# Altium PCB stabilizer_current_sense.PcbDoc (part 2 of 3)
Units mm, origin at the board's own origin, x right, y up, seen from the top; angles counter-clockwise.
Board outline 113.55 x 100 mm, 4 copper layers (Top, L2, L3, Bottom Layer), stack 1.579 mm thick; 178 components, 65 nets, 463 pads, 231 vias.
Unrouted connection lines stored in the file: 53.
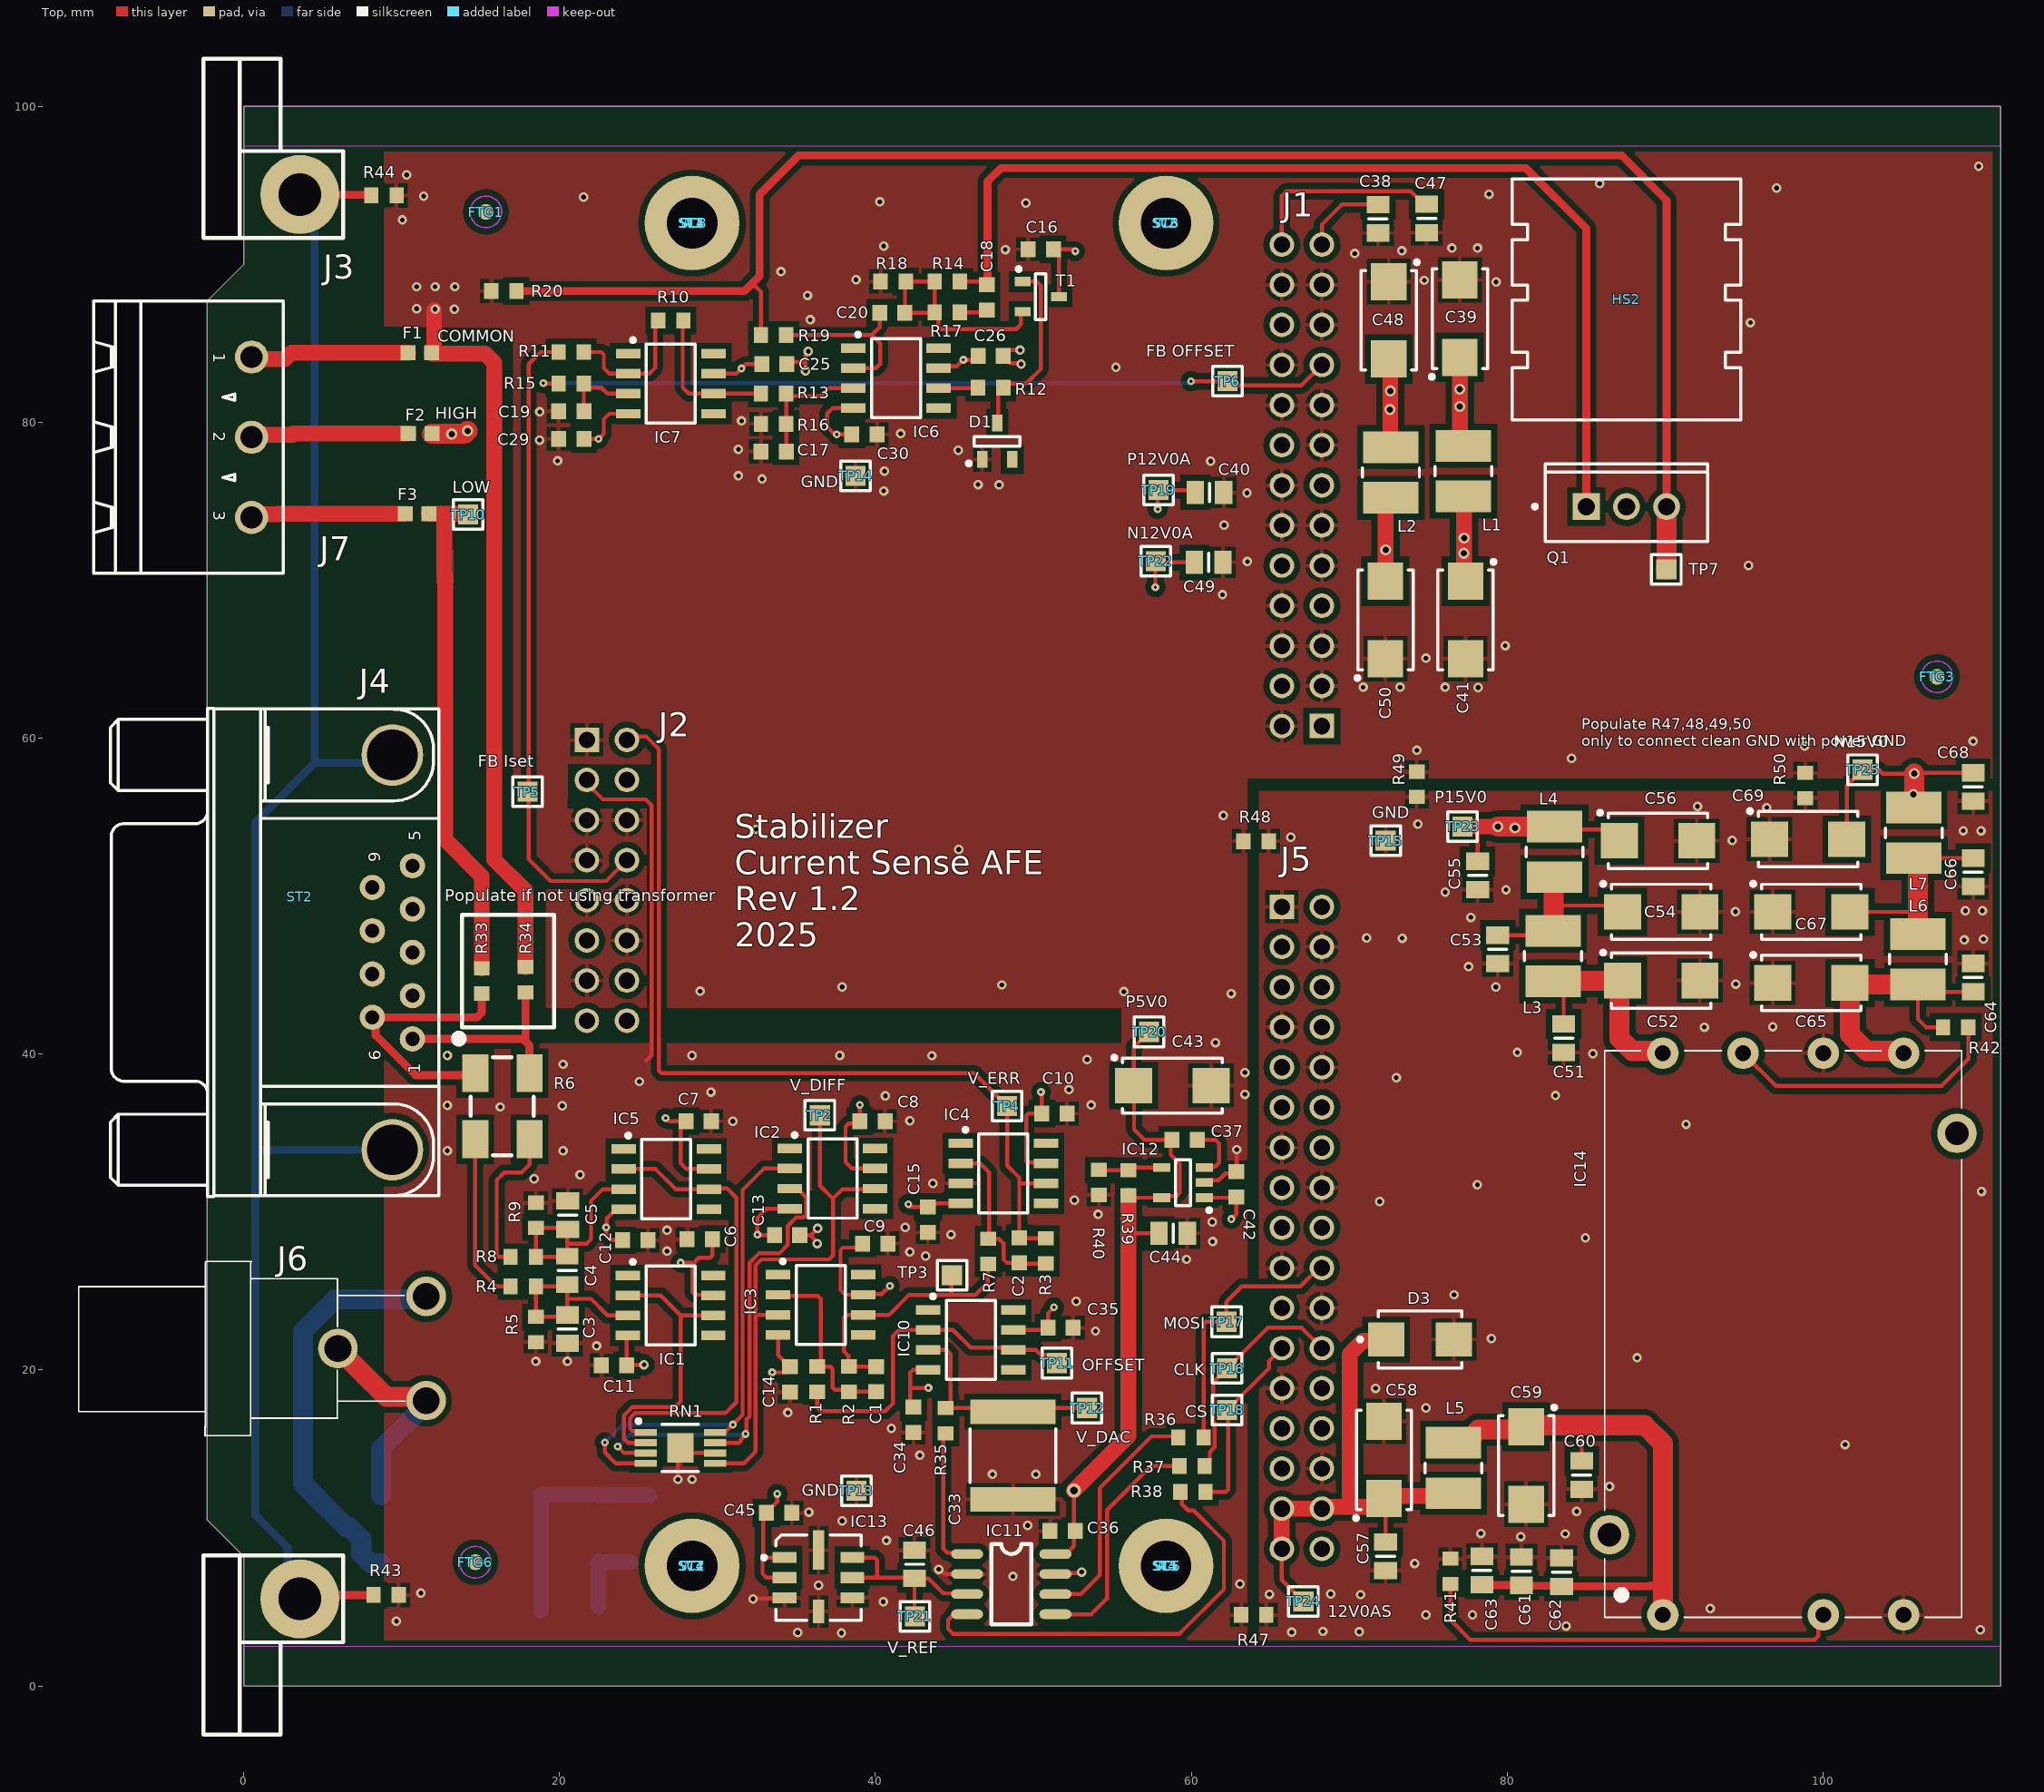
[diagram p0: Top view]

## Part data (continued)
TP2 TP3 TP4 TP5 TP6 TP7 TP10 TP11 TP12 TP13 TP14 TP15 TP16 TP17 TP18 TP19 TP20 TP21 TP22 TP23 TP24 TP25: library part SMD_PAD_1.27X1.27MM, Author="CERN DEM JLC", ComponentHeight=0mm, Component Type="Standard (No BOM)", CreateDate=12/01/2008, Family="Test Point", HelpURL=Undefined, LatestRevisionDate=12/01/2008, Mounted=No, PackageDescription="1.27mm x 1.27mm PCB Copper Area (SMD Test Point)", Part Description="1.27mm x 1.27mm PCB Copper Area (SMD Test Point)", Part Number=SMD_PAD_1.27X1.27MM, Pin Count=1, Sense=No, SMD=Yes, Socket=No, Status=None
W1 W2 W3 W4: "M3 Washer: / ID: 3.2mm / OD: 6mm / Thickness 0.8mm", Manufacturer="Accu Limited", Manufacturer Part Number=HAFZ-M3-A4

## Free pads (board coordinates)
  round 6 hole 3.2: 1(28.4,7.6) 1(28.4,92.6) 1(58.4,7.6) 1(58.4,92.6)

## Via types
v1: diameter 0.6, hole 0.3, Top to Bottom Layer, tented both sides, 191 vias
v2: diameter 0.5, hole 0.2, Top to Bottom Layer, tented both sides, 26 vias
v3: diameter 0.7, hole 0.4, Top to Bottom Layer, tented both sides, 13 vias
v4: diameter 0.9, hole 0.5, Top to Bottom Layer, tented both sides, 1 vias

## Nets (pads, with @x,y where several pads share a name; then routed paths per layer and width w, separated by ;. In a path a pad name is that pad's centre, name@x,y a point inside that pad or via, vN(x,y) a via of type N, cw(c..) or ccw(c..) an arc to the next point about the centre after c; other vN are vias at no path point)
ADC0_P: C2.2 IC4.6 J2.2 R3.2 TP4.1 | length 57.8
  Top w0.254: J2.2@24.27,59.89 24.467,60.087 25.501,60.087 26.3,59.288 26.3,38.939 26.449,38.79 46.249,38.79 TP4.1@48.343,36.696 48.343,32.931 49.109,32.165 49.109,31.821 ; R3.2@50.79,28.337 49.147,28.337 C2.2@49.109,28.375 49.109,31.821 ; IC4.6@50.801,31.812 49.119,31.812 49.109,31.821
AUX_DAC0: J1.19 R15.1 TP6.1 | length 51
  Top w0.254: v2(18.982,82.475) 19.02,82.437 R15.1@19.94,82.437 ; v2(59.984,82.591) TP6.1@62.3,82.591 62.808,82.32 66.97,82.32 J1.19@68.27,83.62 J1.19@68.199,83.549
  Bottom Layer w0.254: v2(18.982,82.475) 59.801,82.475 59.917,82.591 v2(59.984,82.591)